# Altium PCB PCB_7000_0303_Rev13.PcbDoc (part 3 of 3)
Units mil, origin at the board's own origin, x right, y up, seen from the top; angles counter-clockwise.
Board outline 6252 x 3995 mil, 4 copper layers (Top Layer, Power, GND, Bottom Layer), stack 62.449 mil thick; 124 components, 105 nets, 610 pads, 262 vias.
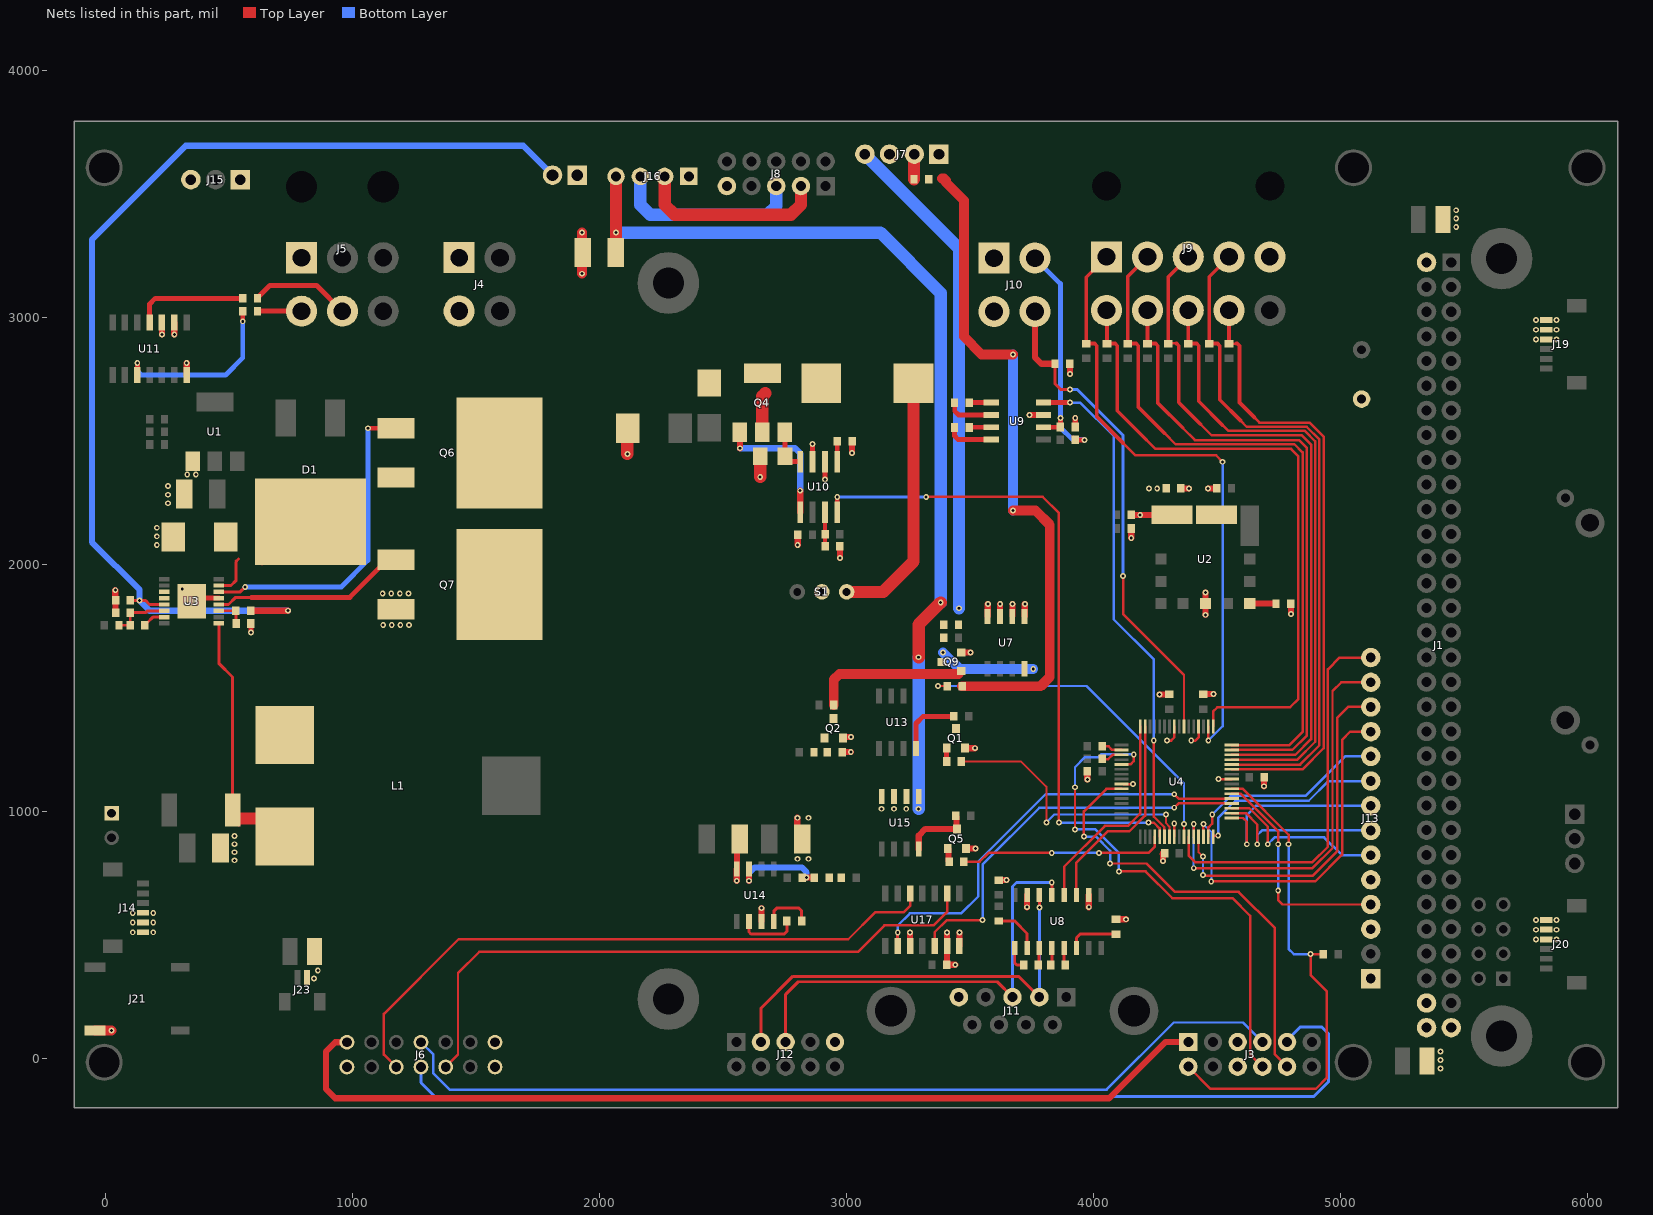
[diagram p4: the nets of this part, all layers, seen from the top]

## Via types
v1: diameter 23.62, hole 11.81, Top Layer to Bottom Layer, 262 vias

## Nets (pads, with @x,y where several pads share a name; then routed paths per layer and width w, separated by ;. In a path a pad name is that pad's centre, name@x,y a point inside that pad or via, vN(x,y) a via of type N, cw(c..) or ccw(c..) an arc to the next point about the centre after c; other vN are vias at no path point) (continued)
DCIN_RVP: C1.1 D1.2 Q6.2 U3.15 | length 575.7
  Top Layer w12: U3.15@458.24,1914.98 507.98,1914.98 527,1934 527,2011 538,2022 ; D1.2@633.06,2003 714.06,2084 D1.2@748,2084 ; D1.2@641,2004.96 810,2173.96 D1.2@829,2173.96
FCOFF: R43.1 U11.11 | length 460.9
  Top Layer w20: U11.11@178,2980.6 178,3055 201,3078 R43.1@555,3078
FCON: R42.1 U11.3 | length 733.2
  Top Layer w20: U11.3@128,2768 v1(128,2816.6) ; v1(555,2985) R42.1@555,3026
  Bottom Layer w20: v1(128,2816.6) 128,2784 145,2767 485,2767 555,2837 v1(555,2985)
GND: C1.2 C2.2 C3.2 C4.1 C5.2 C6.2 C7.1 C8.1 C9.1 C10.1 C11.2 C12.1 C17.1 C18.1 C20.1 C21.1 C22.1 C28.1 C31.1 C32.2 C33.1 C34.2 C35.1 C37.2 C38.2 C44.1 C45.2 J1.2 J1.62 J1.63 J1.64 J3.5 J3.6 J4.1 J4.3 J5.1 J6.1 J6.13 J6.14 J7.2 J7.3 J8.9 J9.5 J10.1 J10.3 J11.5 J12.9 J13.1 J13.3 J13.5 J14.4 J14.5 J14.6 J15.1 J15.3 J16.1 J17.1 J18.1 J19.4 J19.5 J19.6 J20.4 J20.5 J20.6 J21.1 J23.1 Q1.2 Q2.2 Q5.2 Q7.3 Q9.2 R4.2 R7.1 R9.1 R19.1 R25.1 R28.1 R40.1 U1.1 U2.3 U2.7 U3.3 U3.4 U3.13 U3.17 U4.9 U4.20 U4.25 U4.41 U4.56 U8.10 U8.15 U9.7 U10.6 U10.7 U11.7 U11.9 U11.10 U14.3 U14.8 U17.3 U17.6 U17.7 | length 3094.2
  Top Layer w10: U4.41@4123.87,1110.94 v1(4161,1110.94) ; v1(4298.57,1287) 4315.57,1287 4328.16,1299.58 U4.25@4328.16,1344.23 ; U4.56@4328.16,897.77 v1(4328.16,950.84) ; v1(4397,1287) 4414,1287 4426.58,1299.58 U4.20@4426.58,1344.23 ; v1@4507.15,1130.82 U4.9@4561.23,1130.84
  Top Layer w20: U3.17@348,1851 360.8,1863.8 U3.13@458.24,1863.8 ; C10.1@588,1761 589,1760 v1(589,1725) ; U10.7@2863,2416.43 v1(2863,2487.85) ; v1(2913,2345) U10.6@2913,2416.43
  Top Layer w22: C44.1@3927,2557 v1(3927,2594)
  Top Layer w25: v1(39,1896) 39,1856 C12.1@40,1855 C11.2@40,1805 ; v1(228,2932) U11.10@228,2980.6 ; v1(278,2932) U11.9@278,2980.6 ; U3.17@310,1889 v1(310,1901) 348,1863 U3.17@348,1851 ; U11.7@328,2768 v1(328,2816.6) ; v1(2556,719) U14.8@2556,766.3 2556.69,766.99 2556.69,875.76 C34.2@2568.93,888 ; U14.3@2656,553.7 v1(2656,608) ; v1@2801,974 2801,908.93 C35.1@2821.93,888 ; C45.2@2802.75,2120.32 2802.75,2115.44 2802.88,2115.32 v1(2802.88,2079.12) ; v1(2974,2026) R28.1@2974,2074 ; R40.1@2983,1240 2984,1241 v1(3018,1241) ; Q2.2@2985.4,1297.63 2985.4,1298.36 2989.04,1302 v1(3019,1302) ; v1(3023,2452) C33.1@3023,2500 ; U17.3@3258,454.7 v1(3258,509) ; C20.1@3407,379 C20.1@3408,379 ; v1(3408,509) U17.6@3408,454.7 C20.1@3408,379 ; v1(3441,379) C20.1@3408,379 ; U17.7@3458,454.7 v1(3458,509) ; Q9.2@3465.37,1643.4 3465.97,1644 v1(3503,1644) ; Q1.2@3481.4,1256.26 3481.53,1256.13 v1(3520.87,1256.13) v1@3521,1256 ; Q5.2@3485.4,850.63 3486.03,850 v1(3523,850) ; C28.1@3617,722 v1(3648.06,722) ; v1(3732,612) U8.15@3732,661.46 ; v1(3742,2606) U9.7@3799.3,2606 ; R19.1@3905,2813 3906,2812 v1(3906,2772) ; v1(3976,1129) C22.1@3976,1163 ; v1(3982,612) U8.10@3982,661.46 ; C31.1@4092,563 v1(4132.46,563) ; v1(4154,2107) R9.1@4154,2146 ; v1(4268,1474) C21.1@4308,1474 ; C17.1@4280,828 4282,830 v1(4282,799) ; C4.1@4355,2309 4356,2308 v1(4388,2308) ; C18.1@4446,1474 4447,1475 v1(4487,1475) ; U2.7@4454,1842 U2.7@4454.58,1841.42 ; v1(4454.58,1796.29) U2.7@4454.58,1841.42 ; v1(4454.58,1886.55) U2.7@4454.58,1841.42 ; v1(4465,2308) 4499,2308 C8.1@4500,2309 ; U2.3@4499,2202 U2.3@4500,2203 ; C9.1@4691,1138 C9.1@4692,1139 ; v1(4692,1102) C9.1@4692,1138 ; R7.1@4800,1841 4801,1840 v1(4801,1800)
  Top Layer w40: J21.1@-43.25,113.05 v1(24,113) ; C37.2@1928,3260.93 1929,3259.93 v1(1929,3178) ; C37.2@1929.54,3262.46 v1(1929.54,3344.39)
  Top Layer w50: C37.2@1928,3260.93 1929.54,3262.46 C37.2@1931.07,3264 ; v1(2113,2448) 2113,2550.6 C32.2@2114.4,2552 ; v1(2651,2355) R25.1@2651,2439 ; R4.2@3274,3561 3274,3661 J7.2@3275,3662
  other v1: 5406,-41 5406,-7 5406,27 843.16,323 859.16,355 5792.69,481.38 5876.03,481.38 109.45,510.33 192.55,510.33 5792.69,520.74 5876.03,520.74 109.45,549.69 192.55,549.69 5792.69,560.12 5876.03,560.12 109.45,589.07 192.55,589.07 522,801.96 2802,808 2847,808 522,834.64 522,867.32 522,900 2802,974 2847,974 4507.13,1130.8 1124,1755 1158.68,1755 1193.36,1755 1228.04,1755 1121.88,1883 1156.56,1883 1191.24,1883 1225.92,1883 207,2079.64 207,2114.32 207,2149 252.99,2248 252.99,2282.68 252.99,2317.36 330.32,2364 365,2364 5792.94,2911.38 5876.03,2911.38 5792.94,2950.74 5876.03,2950.74 5792.94,2990.11 5876.03,2990.11 5470,3367 5470,3401 5470,3435
GPS_EN: R30.2 U4.52 | length 839.2
  Top Layer w10: R30.2@3476,796 3540,796 3576,832 v1(3832,832) ; v1(4023,832) 4224,832 4249.42,857.42 U4.52@4249.42,897.77
  Bottom Layer w10: v1(3832,832) v1(4023,832)
J16_2: J8.3 J16.2 | length 776.1
  Top Layer w50: J16.2@2264,3572 2264,3457 2304,3417 2776,3417 2816,3457 J8.3@2816,3533
J16_3: J8.5 J16.3 | length 777.8
  Bottom Layer w50: J16.3@2165.57,3572 2165.57,3456.43 2205,3417 2681,3417 2716,3452 J8.5@2716,3533
J16_4: C37.1 J16.4 U15.5 U15.6 U15.7 U15.8 | length 3851.1
  Top Layer w50: C37.1@2065.93,3264 2067,3265.07 2067,3359 2067.15,3359.15 J16.4@2067.15,3572 ; v1(3292.69,1624.31) 3292.69,1756.69 v1(3382,1846)
  Bottom Layer w50: v1(2067,3344.39) 3137.61,3344.39 3382,3100 v1(3382,1846) ; v1(3292.69,1010.59) v1(3292.69,1624.31)
  other v1: 3142.69,1010.59 3192.69,1010.59 3242.69,1010.59
LED_GRN: J5.5 R43.2 | length 410.5
  Top Layer w20: R43.2@615,3078 615,3080.5 665.5,3131 853.71,3131 J5.5@958.64,3026.07
LED_RED: J5.6 R42.2 | length 178.3
  Top Layer w20: R42.2@615,3026 J5.6@793.25,3026.03
LITE_NEN: U4.53 U10.4 | length 2691.5
  Top Layer w10: v1(3323.25,2273.75) 3795.25,2273.75 3861,2208 v1(3861,955) ; v1(4224,955) 4245.07,955 4268.59,931.48 4268.59,898.28 U4.53@4269.1,897.77
  Top Layer w20: U10.4@2963,2211.7 v1(2963,2273.75)
  Bottom Layer w10: v1(3861,955) v1(4224,955)
  Bottom Layer w12: v1(2963,2273.75) v1(3323.25,2273.75)
MB_EN: R17.2 U4.55 | length 1125.7
  Top Layer w8: R17.2@3466,1202 3708,1202 3810,1100 v1(3810,955) ; v1(4295,988) 4295,952 4308.47,938.53 U4.55@4308.47,897.77
  Bottom Layer w8: v1(3810,955) 3843,988 v1(4295,988)
NetC10_2: C10.2 R13.1 U3.11 | length 121.3
  Top Layer w12: U3.11@458.24,1812.61 458.43,1812.81 526.81,1812.81 R13.1@527,1813 527.5,1812.5 527.5,1761.5 C10.2@528,1761
NetC11_1: C11.1 R5.1 R6.2 U3.6 | length 237.3
  Top Layer w12: R6.2@54,1754 R5.1@99,1754 99.5,1754.5 99.5,1804.5 C11.1@100,1805 161.75,1805 169.36,1812.61 U3.6@237.76,1812.61
NetC25_1: C25.1 U14.2 | length 270.6
  Top Layer w12: U14.2@2611.81,529.19 U14.2@2606,553.7 2606,511.73 2615.03,502.7 2747.67,502.7 2759,514.03 C25.1@2759,556
NetC25_2: C25.2 U14.4 | length 205.8
  Top Layer w12: U14.4@2706,553.7 2706,596 2718,608 2808,608 2819,597 C25.2@2819,556
NetC27_1: C27.1 U8.2 | length 194.8
  Top Layer w12: C27.1@3617,556 3682,556 3732,506 U8.2@3732,446.91
NetC29_1: C29.1 U8.3 | length 70.6
  Top Layer w12: C29.1@3778,378 3780,380 3780,444.91 U8.3@3782,446.91
NetC29_2: C29.2 U8.1 | length 100
  Top Layer w12: U8.1@3682,446.91 3682,386.38 3690.38,378 C29.2@3718,378
NetC30_1: C30.1 U8.4 | length 71
  Top Layer w12: C30.1@3827,378 3832,383 U8.4@3832,446.91
NetC30_2: C30.2 U8.5 | length 71
  Top Layer w12: U8.5@3882,446.91 3882,383 C30.2@3887,378
NetC31_2: C31.2 U8.6 | length 207.3
  Top Layer w12: U8.6@3932,446.91 3932,488 3947,503 C31.2@4092,503
NetC33_2: C33.2 U10.5 | length 83.6
  Top Layer w20: U10.5@2963,2416.43 C33.2@2963,2500
NetC41_1: C41.1 U9.2 | length 188.3
  Top Layer w20: C41.1@3438,2655 3438.96,2654.04 3438.96,2621.04 3454,2606 U9.2@3586.7,2606
NetC41_2: C41.2 U9.1 | length 87.7
  Top Layer w20: C41.2@3499,2656 U9.1@3586.7,2656
NetC42_1: C42.1 U9.4 | length 188.9
  Top Layer w20: C42.1@3438,2555 3438.46,2554.54 3438.46,2520.54 3453,2506 U9.4@3586.7,2506
NetC42_2: C42.2 U9.3 | length 87.7
  Top Layer w20: C42.2@3499,2556 U9.3@3586.7,2556
NetC43_1: C43.1 C44.2 J10.2 U9.6 | length 997.7
  Top Layer w15: C43.1@3919.5,2515 C43.1@3927,2505
  Top Layer w20: U9.6@3799.3,2556 C44.2@3864,2556 ; C44.2@3867,2557 v1(3867,2594) ; C43.1@3927,2505 v1(3964,2505)
  Bottom Layer w20: J10.2@3763.68,3241 3867,3137.68 3867,2555 3916.31,2505.69 3963.31,2505.69 v1(3964,2505)
NetD4_1: D4.1 L5.1 Q4.2 Q4.4 | length 164.2
  Top Layer w50: Q4.2@2659.45,2535 2659.45,2681.45 2672,2694
NetJ7_4: J7.4 R23.1 | length 1996.8
  Bottom Layer w50: J7.4@3075,3662 3075,3661.07 3456,3280.07 v1(3456,1823)
NetL1_1: L1.1 Q6.3 Q7.2
NetL5_2: L5.2 S1.2 | length 1044
  Top Layer w50: S1.2@3001,1889 3149,1889 3272.02,2012.02 L5.2@3272.02,2734
NetQ1_1: Q1.1 R17.1 | length 54.5
  Top Layer w20: R17.1@3406,1202 3406.3,1202.3 3406.3,1255.96 Q1.1@3406.6,1256.26
NetQ1_3: Q1.3 R21.1 U13.4 | length 266.3
  Top Layer w20: U13.4@3282,1254.7 3282,1356 3311,1385 R21.1@3435,1385
NetQ2_1: Q2.1 R40.2 R41.2
NetQ4_1: Q4.1 U10.1 | length 555.1
  Top Layer w25: v1(2568.9,2471) Q4.1@2568.9,2535 ; U10.1@2813,2211.7 v1(2813,2299)
  Bottom Layer w25: v1(2568.9,2471) 2792,2471 2813,2450 v1(2813,2299)
NetQ4_3: Q4.3 R25.2 U10.8 | length 168.9
  Top Layer w20: Q4.3@2751,2535 2751,2436.43 2771,2416.43 U10.8@2813,2416.43
NetQ5_1: Q5.1 R30.1 | length 56.9
  Top Layer w25: Q5.1@3410.6,850.63 3413.5,847.73 3413.5,798.5 R30.1@3416,796
NetQ5_3: Q5.3 R31.1 U15.4 | length 277.1
  Top Layer w25: U15.4@3293,847 3293,902 3320.37,929.37 Q5.3@3448,929.37 3445.76,931.61 3445.76,972.74 3445.5,973 3445.5,977 R31.1@3440.5,982
NetQ9_3: Q9.3 R23.2 R27.2 U7.4 | length 392.8
  Bottom Layer w40: v1(3392,1644) 3459,1577 v1(3757,1577)
NetR5_2: R5.2 U3.7 | length 93.9
  Top Layer w12: R5.2@159,1754 159,1756.5 168,1765.5 169.52,1765.5 190.93,1786.91 237.65,1786.91 U3.7@237.76,1787.02
NetR7_2: R7.2 U2.6 | length 105
  Top Layer w25: U2.6@4634,1842 R7.2@4739,1842
NetR24_2: R24.2 R45.1
PWR_BYP: J7.1 Q2.3 Q9.1 R4.1 R16.1 R22.1 | length 3320.5
  Top Layer w40: R16.1@2949,1431 2949,1533.57 2972.43,1557 Q9.1@3453.77,1557 ; 3387,3563 3396,3563 3403,3556 3403,3547 3476,3474 3476,2923 3548,2851 v1(3675,2851) ; R22.1@3469,1507 3787.25,1507 3824,1543.75 3824,2161 3766,2219 v1(3675,2219)
  Bottom Layer w40: v1(3675,2219) v1(3675,2851)
PWR_EN: R22.2 U4.58 | length 1414.1
  Top Layer w10: v1(3371,1508) 3408,1508 R22.2@3409,1507 ; U4.58@4367.53,897.77 v1(4367.53,948.9)
  Bottom Layer w10: v1(3371,1508) 3973,1508 4367.53,1113.47 v1(4367.53,948.9)
RAY_NEN: U4.54 U9.8 | length 2051.5
  Top Layer w10: v1(4245,1287) 4245,979.11 4288.28,935.84 4288.28,898.28 U4.54@4288.79,897.77
  Top Layer w20: U9.8@3799.3,2656 v1(3906,2656)
  Bottom Layer w10: v1@3902,2656 v1(3906,2656) 3947,2656 4083,2520 4083,1778 4244.19,1616.81 4244.19,1287.81 v1(4245,1287)
RB6: J3.10 U4.42 | length 1831.9
  Top Layer w10: v1(3962,898) 3962,1000 4053.47,1091.47 U4.42@4114.77,1091.47 ; v1(4068.28,789) 4216,789 4331,674 4589,674 4735.6,527.4 4735.6,15.4 J3.10@4785,-34
  Bottom Layer w10: v1(3962,898) 4011,898 4068.28,840.72 v1(4068.28,789)
RB6_MB: J3.9 J6.7 | length 4178.6
  Bottom Layer w12: J6.7@1277,-35 1277,-98.55 1333.95,-155.5 4892.5,-155.5 4952,-96 4952,100 4925.6,126.4 4838.4,126.4 J3.9@4788,76
RB7: J3.8 U4.37 | length 2124.1
  Top Layer w10: v1(3926,927) v1(3926,1098) ; v1(4104,757) 4212,757 4320,649 4564,649 4636,577 4636,78 4635.6,77.6 4635.6,15.4 J3.8@4685,-34 ; U4.37@4114.77,1189.9 4115.28,1190.41 4150.41,1190.41 4164,1204 v1(4164,1231)
  Bottom Layer w10: v1(3926,927) 4009,927 4104,832 v1(4104,757) ; v1(3926,1098) 3926,1179 3967,1220 4022,1220 4033,1231 v1(4164,1231)
RB7_MB: J3.7 J6.8 | length 3677.4
  Bottom Layer w10: J6.8@1277,65 1327,15 1327,-61 1393,-127 4054,-127 4326,145 4606,145 J3.7@4685,66
RE0: J13.7 U4.2 | length 706.1
  Top Layer w10: U4.2@4561.23,993.05 4617.95,993.05 4664.33,946.67 v1(4664.33,867)
  Bottom Layer w10: v1(4664.33,867) 4664.33,903.33 4684,923 J13.7@5124,923
RE1: J13.8 U4.1 | length 794.5
  Top Layer w10: U4.1@4561.23,973.36 4606.64,973.36 4622,958 v1(4622,867)
  Bottom Layer w10: v1(4622,867) 4622,986 4659,1023 J13.8@5124,1023
RE2: J13.9 U4.64 | length 776
  Top Layer w10: U4.64@4485.64,897.77 4485.64,901.49 4486.15,902 v1(4506,902)
  Bottom Layer w10: v1(4506,902) 4506,974 4575,1043 4873,1043 4953,1123 J13.9@5124,1123
RE3: J13.10 U4.63 | length 836.2
  Top Layer w10: U4.63@4465.95,897.77 4466.46,898.28 4466.46,935.42 4482,950.96 v1(4482,988)
  Bottom Layer w10: v1(4482,988) 4557,1063 4860,1063 5020,1223 J13.10@5124,1223
RE4: J13.11 U4.62 | length 1467.7
  Top Layer w10: U4.62@4446.27,897.77 U4.62@4446.27,912.19 ; v1(4446.27,948.9) U4.62@4446.27,912.19 ; U4.62@4446.78,911.67 U4.62@4446.27,912.19 ; v1(4478,716) 4478.19,716.19 4899.19,716.19 5008,825 5008,1290 5041,1323 J13.11@5124,1323
  Bottom Layer w8: v1(4446.27,948.9) 4478,917.17 v1(4478,716)
RE5: J13.12 U4.61 | length 1442.8
  Top Layer w8: U4.61@4426.58,897.77 4426.58,834.42 v1(4444,817)
  Top Layer w10: v1@4444,740 4890,740 4989,839 4989,1380 5032,1423 J13.12@5124,1423
  Bottom Layer w8: v1(4444,742) v1(4444,817)
RE6: J13.13 U4.60 | length 1631.6
  Top Layer w10: v1(4406.9,770) 4888,770 4969,851 4969,1487 5005,1523 J13.13@5124,1523 ; U4.60@4406.9,897.77 v1(4406.9,948.9)
  Bottom Layer w8: v1(4406.9,770) v1(4406.9,948.9)
RE7: J13.14 U4.59 | length 1590.3
  Top Layer w10: U4.59@4387.21,897.77 4387.21,819.79 4413.81,793.19 4886.47,793.19 4950,856.72 4950,1575 4998,1623 J13.14@5124,1623
RF0: J9.1 R33.2 U4.18 | length 2513.9
  Top Layer w10: 4120.5,2492.5 4171,2442 4498,2442 v1(4524,2416) ; v1(4465.95,1287) U4.18@4465.95,1344.23
  Top Layer w15: J9.1@4054,3246 3972,3164 R33.2@3972,2895 4005.21,2895 4014,2886.21 4014,2599 4120.5,2492.5
  Bottom Layer w10: v1(4465.95,1287) 4524,1345.05 v1(4524,2416)
RF1: J9.6 R39.2 U4.17 | length 2663.4
  Top Layer w10: 4215.04,2504.96 4252,2468 4801,2468 4831,2438 4831,1456 4797,1422 4503,1422 4485.64,1404.64 U4.17@4485.64,1344.23
  Top Layer w15: J9.6@4055.57,3027.89 R39.2@4055.57,2895 4088.78,2895 4097.57,2886.21 4097.57,2622.43 4215.04,2504.96
  Top Layer w20: J9.6@4054,3029.46 J9.6@4055.57,3027.89
RF2: J9.2 R34.2 U4.16 | length 2860.6
  Top Layer w10: 4288.14,2532 4333.14,2487 4815,2487 4848,2454 4848,1322 4794.64,1268.64 U4.16@4561.23,1268.64
  Top Layer w15: J9.2@4219.35,3246 4140.14,3166.79 R34.2@4140.14,2895 4173.36,2895 4182.14,2886.21 4182.14,2638 4288.14,2532
RF3: J9.7 R38.2 U4.15 | length 2612.6
  Top Layer w10: R38.2@4219.83,2895.11 4248.83,2895.11 ; 4362.5,2553.5 4412,2504 4833,2504 4865,2472 4865,1308 4805.95,1248.95 U4.15@4561.23,1248.95
  Top Layer w15: J9.7@4219.53,3029.28 4219.53,2895.18 4252.75,2895.18 4261.53,2886.39 4261.53,2654.47 4362.5,2553.5
  Top Layer w20: J9.7@4219.35,3029.46 J9.7@4219.53,3029.28 ; R38.2@4219.53,2895.18 R38.2@4219.71,2895 R38.2@4219.83,2895.11
RF4: J9.3 R35.2 U4.14 | length 2803.3
  Top Layer w10: R35.2@4305.3,2896.01 4334.3,2896.01 ; 4434.79,2568.22 4480,2523 4845,2523 4882,2486 4882,1293 4818.27,1229.27 U4.14@4561.23,1229.27
  Top Layer w15: R35.2@4304.29,2895 4304.29,3165.58 J9.3@4384.71,3246 ; 4337.5,2895 4346.29,2886.21 4346.29,2656.71 4434.79,2568.22
  Top Layer w20: R35.2@4304.29,2895 R35.2@4305.3,2896.01
RF5: J9.8 R37.2 U4.13 | length 2529.3
  Top Layer w10: 4522.76,2565.24 4547,2541 4857,2541 4899,2499 4899,1282 4826.58,1209.58 U4.13@4561.23,1209.58
  Top Layer w15: R37.2@4384.85,2895.15 J9.8@4384.85,3029.32 ; R37.2@4385,2895 4418.21,2895 4427,2886.21 4427,2661 4522.76,2565.24
  Top Layer w20: J9.8@4384.71,3029.46 J9.8@4384.85,3029.32 ; R37.2@4384.85,2895.15 R37.2@4385,2895
RF6: J9.4 R36.2 U4.12 | length 2795.1
  Top Layer w8: R36.2@4470.01,2902.01 R36.2@4477.01,2895.01
  Top Layer w10: R36.2@4477.02,2895 4499,2895 4512,2882 ; U4.12@4561.23,1189.9 4837.9,1189.9 4916,1268 4916,2506.04 4864.04,2558 4621,2558 4596,2583
  Top Layer w15: J9.4@4550.06,3246 4470,3165.94 R36.2@4470,2895 4477.01,2895.01 4503.22,2895.01 4512.01,2886.22 4512.01,2666.99 4596,2583
RF7: J9.9 R32.2 U4.11 | length 2496.2
  Top Layer w10: R32.2@4550,2895 4579,2895 4592,2882 ; U4.11@4561.23,1170.21 4847.21,1170.21 4933,1256 4933,2518 4876,2575 4673,2575 4653,2595
  Top Layer w15: R32.2@4550,2895 J9.9@4550.03,3029.43 ; 4579,2895 4583.21,2895 4592,2886.21 4592,2882 4592,2656 4653,2595
RG0: J13.6 U4.3 | length 706.3
  Top Layer w10: U4.3@4561.23,1012.73 4632.23,1012.73 4706.67,938.29 v1(4706.67,867)
  Bottom Layer w10: v1(4706.67,867) 4734.67,895 4935,895 5007,823 J13.6@5124,823
RG3: J13.4 U4.6 | length 912.1
  Top Layer w10: U4.6@4561.23,1071.79 4561.74,1071.28 4597.72,1071.28 4749,920 v1(4749,867) ; v1(4749,679) 4749,641 4767,623 J13.4@5124,623
  Bottom Layer w10: v1(4749,679) v1(4749,867)
RX-: J6.6 U17.11 | length 2493
  Top Layer w10: J6.6@1177,65 1177,182 1460,465 3020.7,465 3127.7,572 3287.7,572 3308,592.3 U17.11@3308,667.3
RX+: J6.5 U17.12 | length 2597.8
  Top Layer w10: J6.5@1177,-35 1127,15 1127,180 1429,482 3007.7,482 3118,592.3 3233,592.3 3258,617.3 U17.12@3258,667.3
SCL: R20.1 U4.34 | length 85
  Top Layer w10: R20.1@4036,1264 4062,1264 4076.54,1249.46 4114.26,1249.46 U4.34@4114.77,1248.95
SDA: R18.2 U4.35 | length 87.3
  Top Layer w10: R18.2@4036,1213.5 4038.36,1211.14 4060.14,1211.14 4078.27,1229.27 U4.35@4114.77,1229.27
TEMP: J10.4 R19.2 U4.23 | length 2001.8
  Top Layer w10: v1(4121,1953) 4121,1799 4367.53,1552.47 U4.23@4367.53,1344.23
  Top Layer w12: R19.2@3845,2813 3845,2732.03 3867.56,2709.47 v1@3904.85,2709.47
  Top Layer w25: J10.4@3763.68,3024.47 3763.68,2839.32 3790,2813 R19.2@3845,2813
  Bottom Layer w12: v1@3904.85,2709.47 3934.53,2709.47 4121,2523 v1(4121,1953)
  other v1: 3906,2709.47
TX-: J6.10 U17.10 | length 2433.7
  Top Layer w10: J6.10@1377,65 1377,337 1488,448 3033.7,448 3140.7,555 3320.7,555 3358,592.3 U17.10@3358,667.3
TX+: J6.9 U17.9 | length 2559.1
  Top Layer w10: J6.9@1377,-35 1427,15 1427,345 1513,431 3046.7,431 3153.7,538 3353.7,538 3408,592.3 U17.9@3408,667.3
U2VIN: C4.2 R8.1 S1.1 U2.2 U7.5 U7.6 U7.7 U7.8 | length 361.6
  Top Layer w25: U7.8@3572,1790.3 3572.69,1790.99 3572.69,1839.69 v1(3573,1840) ; U7.7@3622.69,1790.99 v1@3622.69,1839.69 ; U7.6@3672.69,1790.99 v1@3672.69,1839.69 ; U7.5@3722.69,1790.99 v1@3722.69,1839.69 ; R8.1@4154,2201 v1(4190,2201) 4318,2201 U2.2@4319,2202
  other v1: 3623,1840 3673,1840 3723,1840 4226,2308 4259,2308
U3BGATE: Q7.1 U3.12 | length 791.6
  Top Layer w12: U3.12@458.24,1838.2 497.89,1838.2 526.68,1867 590,1867 ; Q7.1@1140.91,2019 Q7.1@1174.96,2019
  Top Layer w20: 590,1867 988.91,1867 Q7.1@1140.91,2019
U3SENSE: L1.2 R11.2 U3.9 | length 1123
  Top Layer w12: U3.9@458.24,1761.43 458.24,1599.76 513.95,1544.05 R11.2@513.95,1005 513.95,969.57 R11.2@539.45,944.07
  Top Layer w50: R11.2@513.95,1005 513.95,977.5 520.45,971 653.52,971 L1.2@725.83,898.68
U3TGATE: Q6.1 U3.14 | length 1304.9
  Top Layer w12: U3.14@458.24,1889.39 545.39,1889.39 v1(565,1909)
  Top Layer w20: v1(1062,2552) Q6.1@1175,2552
  Bottom Layer w20: v1(565,1909) 954.39,1909 1062,2016.61 v1(1062,2552)
U8RIN1: J11.3 J12.5 U8.13 | length 1823
  Top Layer w12: J12.5@2754,66 2754,259 2805,310 3610.77,310 J11.3@3672.87,247.9 ; U8.13@3832,661.46 v1(3832,712)
  Bottom Layer w12: J11.3@3672.87,247.9 3672.87,695.87 3689,712 v1(3832,712)
U8T1OUT: J11.2 J12.3 U8.14 | length 1766.6
  Top Layer w12: J12.3@2654,66 2654,203 2783,332 3697.43,332 J11.2@3781.53,247.9 ; v1(3782,610.92) U8.14@3782,661.46
  Bottom Layer w12: J11.2@3781.53,247.9 3781.77,248.13 3781.77,610.68 v1(3782,610.92)
U10FB: R26.1 R28.2 U10.3 | length 138.1
  Top Layer w15: U10.3@2913,2211.7 2913.5,2211.2 2913.5,2074.5 R28.2@2914,2074
U14FB: R24.1 R29.2 U14.7 | length 364.2
  Top Layer w25: v1(2606,719) U14.7@2606,766.3 ; v1(2839,732) 2852.5,732
  Bottom Layer w25: v1(2606,719) 2606,751 2628,773 2819,773 2839,753 v1(2839,732)
UARTRX1: U4.32 U8.12 | length 865
  Top Layer w10: U8.12@3882,661.46 3882,776 4047,941 4140,941 4190.36,991.36 U4.32@4190.36,1344.23
UARTRX2: U4.5 U17.2 | length 1746.5
  Top Layer w10: v1(4328.16,1069.52) 4345.57,1052.1 U4.5@4561.23,1052.1
  Top Layer w12: U17.2@3208,454.7 v1(3208,509)
  Bottom Layer w10: v1(3208,509) 3208,538 3257,587 3465,587 3534,656 3534,797 3806.52,1069.52 v1(4328.16,1069.52)
UARTTX1: U4.31 U8.11 | length 849.4
  Top Layer w10: U8.11@3932,661.46 3932,793 4058,919 4145.84,919 4210.05,983.21 U4.31@4210.05,1344.23
UARTTX2: U4.4 U17.5 | length 1607.3
  Top Layer w10: U17.5@3358,454.7 3358,511 3407,560 v1(3552,560) ; v1(4328.16,1015) 4345.57,1032.42 U4.4@4561.23,1032.42
  Bottom Layer w10: v1(3552,560) 3552,785 3782,1015 v1(4328.16,1015)
VPP: J3.2 R10.2 U4.7 | length 2063.7
  Top Layer w10: J3.2@4385,-34 4475,-124 4900.99,-124 4945,-79.99 4945,272 4880,337 v1(4880,422) R10.2@4932,422 ; U4.7@4561.23,1091.47 4561.74,1090.96 4606.04,1090.96 4791.33,905.67 v1(4791.33,867)
  Bottom Layer w10: v1(4791.33,867) 4791.33,442.67 4812,422 v1(4880,422)
VPP_MB: J3.1 J6.2 | length 3854.9
  Top Layer w25: J6.2@977,65 930,65 892,27 892,-124 930,-162 4064,-162 4292,66 J3.1@4385,66
VTEMP: C12.2 J17.2 R13.2 U3.5 | length 4530.3
  Top Layer w12: C12.2@100,1855 101,1854 v1(137,1854) 162,1854 177.8,1838.2 U3.5@237.76,1838.2
  Top Layer w25: R13.2@587,1813 v1(739,1813)
  Bottom Layer w25: v1(739,1813) 178,1813 v1(137,1854) 137,1898 -56,2091 -56,3316 324,3696 1691,3696 J17.2@1810,3577
pads on no net: J1.1 J1.3 J1.4 J1.5 J1.7 J1.8 J1.9 J1.10 J1.11 J1.12 J1.13 J1.14 J1.15 J1.16 J1.17 J1.18 J1.19 J1.20 J1.21 J1.22 J1.23 J1.24 J1.25 J1.26 J1.27 J1.28 J1.29 J1.30 J1.31 J1.32 J1.33 J1.34 J1.35 J1.36 J1.37 J1.38 J1.39 J1.40 J1.41 J1.42 J1.43 J1.44 J1.45 J1.46 J1.47 J1.48 J1.49 J1.50 J1.51 J1.52 J1.53 J1.54 J1.55 J1.56 J1.57 J1.59 J1.60 J1.61 J2.1 J2.2 J2.4 J2.5 J2.6 J2.8 J3.11 J3.12 J5.2 J5.MH J8.1 J8.2 J8.4 J8.6 J8.7 J8.8 J8.10 J9. J11.1 J11.4 J11.6 J11.7 J11.8 J11.9 J11.10 J11.11 J12.1 J12.2 J12.4 J12.6 J12.7 J12.8 J12.10 J14.MP1 J14.MP2 J19.MP1 J19.MP2 J20.MP1 J20.MP2 J21.3 J21.4 J22.3 J23.3 J23.4 J24.3 L1.3 S1.3 U2.1 U2.8 U2.9 U2.10 U2.11 U2.12 U3.8 U4.8 U4.21 U4.22 U4.27 U4.28 U4.29 U4.30 U4.33 U4.36 U4.39 U4.40 U4.43 U4.44 U4.45 U4.46 U4.47 U4.48 U4.49 U4.50 U4.51 U8.7 U8.8 U8.9 U11.8 U17.1 U17.8 U17.13

## Polygon pours and split planes (outlines as drawn)
GND on Bottom Layer "NONET_L-01_P-001" (solid, pour order 1): -127,3795 -126,3795 6125,3796 6125,-200 -127,-200 -127,-90
GND on Top Layer "NONET_L-01_P-001" (solid, pour order 0): -127,3795 -126,3795 6125,3796 6125,-200 -127,-200 -127,-90
GND on GND (split plane): 6104.9,-179.9 -106.9,-179.9 -106.9,3774.9 6104.9,3774.9
BCKBATT- on GND (split plane): 6056.93,597.07 5628.07,597.07 5628.07,716 5628.07,2342.93 6056.93,2342.93
+9.9V on Power (split plane): 5897.93,2753.57 5745,2753.57 5742.06,2753.28 5739.23,2752.43 5736.63,2751.03 5734.34,2749.16 5732.47,2746.87 5731.07,2744.27 5730.22,2741.44 5729.93,2738.5 5729.93,1637.24 5602.34,1509.66 5600.47,1507.37 5599.07,1504.77 5598.22,1501.94 5597.93,1499 5597.93,1446 5597.93,1445 5597.93,373 5598.22,370.06 5599.07,367.23 5600.47,364.63 5602.34,362.34 5604.63,360.47 5607.23,359.07 5610.06,358.22 5613,357.93 5775.94,357.93 5778.88,358.22 5781.71,359.07 5784.31,360.47 5786.6,362.34 5788.47,364.63 5789.87,367.23 5790.72,370.06 5791.01,373 5791.01,595.93 5929.93,595.93 5929.93,247 5929.93,234.24 5821.34,125.66 5819.47,123.37 5818.07,120.77 5817.22,117.94 5816.93,115 5816.93,-179.9 -106.9,-179.9 -106.9,1036.93 1644,1036.93 1646.94,1037.22 1649.77,1038.07 1652.37,1039.47 1654.66,1041.34 1656.53,1043.63 1657.93,1046.23 1658.78,1049.06 1659.07,1052 1659.07,2182.93 2137,2182.93 2139.94,2183.22 2142.77,2184.07 2145.37,2185.47 2147.66,2187.34 2256.66,2296.34 2258.53,2298.63 2259.93,2301.23 2260.78,2304.06 2261.07,2307 2261.07,2661.93 2402.93,2661.93 2402.93,2302 2403.22,2299.06 2404.07,2296.23 2405.47,2293.63 2407.34,2291.34 2529.34,2169.34 2531.63,2167.47 2534.23,2166.07 2537.06,2165.22 2540,2164.93 3088.93,2164.93 3088.93,1968.07 1804,1968.07 1801.06,1967.78 1798.23,1966.93 1795.63,1965.53 1793.34,1963.66 1791.47,1961.37 1790.07,1958.77 1789.22,1955.94 1788.93,1953 1788.93,712.07 237,712.07 234.06,711.78 231.23,710.93 228.63,709.53 226.34,707.66 224.47,705.37 223.07,702.77 222.22,699.94 222.11,698.83 222.07,698.77 221.22,695.94 220.93,693 220.93,57 221.22,54.06 222.07,51.23 223.47,48.63 225.34,46.34 355.34,-83.66 357.63,-85.53 360.23,-86.93 363.06,-87.78 366,-88.07 5508,-88.07 5510.94,-87.78 5513.77,-86.93 5516.37,-85.53 5518.66,-83.66 5520.53,-81.37 5521.93,-78.77 5522.78,-75.94 5523.07,-73 5523.07,2882.93 5897.93,2882.93
+5V on Power (split plane): 175 vertices, not listed, extent -106.9,-179.9 6104.9,3774.9
BCKBATT+ on Power (split plane): 6048.93,815.07 5775.94,815.07 5773,814.78 5770.17,813.93 5767.57,812.53 5765.28,810.66 5763.41,808.37 5762.01,805.77 5761.16,802.94 5760.87,800 5760.87,388.07 5628.07,388.07 5628.07,1430.93 6048.93,1430.93
U2VIN on Power (split plane): 4405.93,2160.07 4104,2160.07 4101.06,2159.78 4098.23,2158.93 4095.63,2157.53 4093.34,2155.66 3735.76,1798.07 2763.07,1798.07 2763.07,1937.93 3641,1937.93 3643.94,1938.22 3646.77,1939.07 3649.37,1940.47 3651.66,1942.34 4051.24,2341.93 4405.93,2341.93

## Other copper
Top Layer:
  rectangle net U3SENSE: 482,931 845,1072
  region net BATT+: 378,1609.4 378,1715 -28.03,1715 -28.03,1609.4
  rectangle net BATT+: -28,1619 25,1778
  region net NetL1_1: 1772,1510 607.7,1510 607.7,1276.6 1772,1276.6
  region net GND: 1251,1733 1251,1907 1100,1907 1100,1733
  rectangle net DCIN_RVP: 685,2156 1254,2392
  rectangle net GND: 431,784 552.47,915.84
  rectangle net GND: 191,2050 266,2181
  rectangle net GND: 216,1855 323,1898
  rectangle net GND: 226,2050 381.45,2458
  region net +5VLEDS: 223,2698 223,2478 485,2478 485,2698
  rectangle net GND: 92.45,491.56 211.45,602.07
  rectangle net +9.9V: 92.39,609.66 211.39,720.17
  region net +9.9V: 2277,2652 2277,2453 2369,2453 2369,2652
  region net +5V_MB: 3056,1501 3056,711 3099,711 3099,1501
  rectangle net +5V: 3112,1223.7 3252,1326.7
  region net +5V_MB: 2401.48,948.03 2401.48,504 2471,504 2471,948.03
  region net +5V_MB: 2401,602 2401,502.03 2574,502.03 2574,602
  region net +5V_MB: 2570.03,543 2335.03,543 2335.03,502.52 2570.03,502.52
  rectangle net +5V_MB: 3024.5,711 3099,754
  rectangle net -5V_MB: 2656.76,829.5 2742.76,984.38
  rectangle net -5V_MB: 2694,712 2777,756
  rectangle net +5V_MB: 2542,523 2570,587.63
  rectangle net GND: 2782,793 2868,993
  rectangle net NetD4_1: 2617,2493 2692,2676
  rectangle net NetQ9_3: 3710,1546 3781,1610
  rectangle net NetJ7_4: 3430,1733 3481,1841
  rectangle net U2VIN: 4136,2178 4309,2224
  rectangle net U2VIN: 4207.34,2164.01 4310.34,2327.01
  rectangle net NetR24_2: 2909.5,712 2995,755
  rectangle net U14FB: 2800,712 2885,755
  region net +5V: 788,296 788,488 716,488 716,296
  rectangle net +5V: 3596,602 3693,691
  region net -5V_MB: 2731,712 2731,947 2681,947 2681,712
  rectangle net +5V: 3123,816 3263,919
  region net +5V: 5282,45 5174,45 5174,-68 5282,-68
  rectangle net GND: 5322,-67 5430,46
  region net +5V: 5346,3453 5238,3453 5238,3340 5346,3340
  rectangle net BATT+: 3556,1543 3688,1611.87
  rectangle net U2VIN: 3557,1755 3738,1858
  rectangle net +5V: 4545,2284 4659,2335
  rectangle net GND: 4416,2165 4519,2328
  rectangle net +5V: 4597.4,1995.66 4672,2335
  rectangle net GND: 4340,2288 4513,2329
  rectangle net PWR_BYP: 3316,3536 3416,3584
  rectangle net NetD4_1: 2394,2651 2981,2820
  rectangle net NetQ4_3: 2705,2372 2825,2579
  rectangle net NetQ4_3: 2725,2372 2825,2452
  rectangle net +5V_MB: 3056,1437 3295,1501
  rectangle net PWR_BYP: 3447,1489 3491,1585
  rectangle net NetQ9_3: 3369,1589 3411,1777
  rectangle net NetQ1_3: 3418,1316 3465,1407
  rectangle net PWR_BYP: 2929,1358.37 2970,1453.37
  rectangle net NetQ2_1: 2853,1223 2940,1317
  rectangle net GND: 2964,1222 3005,1317
  rectangle net J16_4: 3123,989 3316,1092
  rectangle net GND: 3132,3612 3317,3712
  rectangle net PWR_BYP: 3336,3536 3423,3711
  rectangle net +9.9V: 2277,2493 2497,2614
  rectangle net GND: 5386,3341 5494,3454
  rectangle net DCIN_RVP: 438,1997 1058,2171
  region net DCIN: 606,2607 500.55,2607 500.55,2377 606,2377
  rectangle net DCIN: 573,2497 972,2690
  region net GND: 876.16,296 876.16,488 804.16,488 804.16,296
  rectangle net +5VLEDS: 406,2221 485,2671
  rectangle net NetL1_1: 1417,1275 1771,2672
  rectangle net GND: 215,2949 293,3013
  rectangle net +9.9V: 5776,344.49 5895,455
  rectangle net GND: 5775.94,465 5894.94,575.12
  rectangle net GND: 5775.94,2896 5894.94,3006.11
  rectangle net +9.9V: 5776,2776.49 5895,2887
  region net DCIN_RVP: 604,2349 648,2392 691,2392 725,2358 718,2351 718,2344 604,2344
Bottom Layer:
  rectangle net J16_4: 3122,960 3317,1053
  rectangle net -5V_MB: 2659,800 2749,990
Power (plane layer: these items are gaps in the copper):
  lines w20: 1985,3792 2030,3792
  lines w30: 236,693 236,57 366,-73 965,-73 1864,-73 5508,-73 5508,2898 5913,2898 5913,2738.5 5745,2738.5 5745,1631 5613,1499 5613,1445 ; 237,697 1804,697 1804,1953 3102,1953 3104,1955 3104,2180 2540,2180 2418,2302 2418,2677 2246,2677 2246,2307 2137,2198 1644,2198 1644,1052 595,1052 ; 639,1052 -128,1052 -128,-199 -127,-200 5827,-200 5832,-195 5832,115 5945,228 5945,247 5945,611 5778,611 ; 6064,800 5775.94,800 5775.94,373 5613,373 5613,1446 6064,1446 6064,803 ; 2748,1783 2748,1953 2866,1953 3641,1953 4045,2357 4421,2357 4421,2145 4104,2145 3742,1783 2748,1783
GND (plane layer: these items are gaps in the copper):
  lines w30: 5613,582 6072,582 6072,2358 5613,2358 5613,716 5613,582

## Silkscreen, mask and mechanical layers (free items; w line width, h text height)
Top Overlay:
  text "THERM" at 1726.71,3716.51 h55
  text "GPS" at 2139.69,3716.51 h55
  text "FAN" at 108.03,3547.01 h60
  text "OFF" at 3001.03,3442.01 h60
  text "ON" at 3326.02,3442.01 h60
  text "COMM" at 2604.04,3402.01 h60
  text "BAT" at 1722.03,3108.01 h60
  text "+BL-" at 6087.99,2815.36 h50 r90
  text "ON" at 2578.02,1859.01 h60
  text "OFF" at 3120.03,1858.01 h60
  text "BAT1" at 5805.99,1855.69 h50 r90
  text "+" at 6098.98,1196.35 h110 r90
  text "-BL+" at -95.99,1031.64 h50 r270
  text "PCB: 7000-0303 REV 13" at 5654.49,712.01 h55 r90
  text "PCA: 7500-0390" at 5735.49,711.87 h55 r90
  text "TRANSTECH SYSTEMS, INC" at 5570.33,702.94 h55 r90
  text "+BL-" at -95.99,676.64 h50 r270
  text "+BL-" at 6087.99,385.36 h50 r90
  text "+BL-" at 362.01,333.64 h50 r270
  text "DOMPWR" at 923.22,302.51 h55
  text "PROG" at 4535.43,163.44 h60
  text "COMM" at 2667.04,154.01 h60
Bottom Overlay:
  drawing of 16 lines, arcs and shapes, not listed
Board Outline:
  the board outline again, w30
Fabrication:
  drawing of 295 lines, arcs and shapes, not listed
  text "Layer" at 6695.34,1654 h60
  text "Name" at 7105.26,1654 h60
  text "Material" at 8035,1654 h60
  text "Thickness" at 8894.77,1654 h60
  text "Constant" at 9544.6,1654 h60
  text "Board Layer Stack" at 10114.46,1654 h60
  text "Top Overlay" at 7105.26,1534 h60
  text "Top Solder" at 7105.26,1414 h60
  text "Solder Resist" at 8035,1414 h60
  text "0.39mil" at 8894.77,1414 h60
  text "3.5" at 9544.6,1414 h60
  text "1" at 6695.34,1294 h60
  text "Top Layer" at 7105.26,1294 h60
  text "CF-004" at 8035,1294 h60
  text "1.38mil" at 8894.77,1294 h60
  text "Dielectric 2" at 7105.26,1174 h60
  text "PP-006" at 8035,1174 h60
  text "8.28mil" at 8894.77,1174 h60
  text "4.1" at 9544.6,1174 h60
  text "2" at 6695.34,1054 h60
  text "Power" at 7105.26,1054 h60
  text "0.60mil" at 8894.77,1054 h60
  text "Core" at 7105.26,934 h60
  text "FR-4" at 8035,934 h60
  text "41.93mil" at 8894.77,934 h60
  text "4.8" at 9544.6,934 h60
  text "3" at 6695.34,814 h60
  text "GND" at 7105.26,814 h60
  text "0.60mil" at 8894.77,814 h60
  text "Dielectric 3" at 7105.26,694 h60
  text "PP-006" at 8035,694 h60
  text "8.28mil" at 8894.77,694 h60
  text "4.1" at 9544.6,694 h60
  text "4" at 6695.34,574 h60
  text "Bottom Layer" at 7105.26,574 h60
  text "CF-004" at 8035,574 h60
  text "1.38mil" at 8894.77,574 h60
  text "Bottom Solder" at 7105.26,454 h60
  text "Solder Resist" at 8035,454 h60
  text "0.39mil" at 8894.77,454 h60
  text "3.5" at 9544.6,454 h60
  text "Bottom Overlay" at 7105.26,334 h60
  text "Total board thickness:" at 6695.34,214 h60
  text "63.24mil" at 8894.77,214 h60
Drill Drawing:
  drawing of 177 lines, arcs and shapes, not listed
  text "Symbol" at 6752.28,4367 h72
  text "Count" at 7258.16,4367 h72
  text "Hole Size" at 7858,4367 h72
  text "Plated" at 9007.66,4367 h72
  text "Hole Type" at 9513.54,4367 h72
  text "Drill Layer Pair" at 10247.34,4367 h72
  text "Via/Pad" at 11746.89,4367 h72
  text "Pad Shape" at 12336.74,4367 h72
  text "Template" at 13082.54,4367 h72
  text "Hole Length" at 14432.14,4367 h72
  text "Routed Path Length" at 15297.9,4367 h72
  text "262" at 7258.16,4217 h60
  text "11.81mil (0.300mm)" at 7858,4217 h60
  text "PTH" at 9007.66,4217 h60
  text "Round" at 9513.54,4217 h60
  text "Top Layer - Bottom Layer" at 10247.34,4217 h60
  text "Via" at 11746.89,4217 h60
  text "Rounded" at 12336.74,4217 h60
  text "v60h30" at 13082.54,4217 h60
  text "-" at 14432.14,4217 h60
  text "-" at 15297.9,4217 h60
  text "3" at 7258.16,4067 h60
  text "32.28mil (0.820mm)" at 7858,4067 h60
  text "PTH" at 9007.66,4067 h60
  text "Round" at 9513.54,4067 h60
  text "Top Layer - Bottom Layer" at 10247.34,4067 h60
  text "Pad" at 11746.89,4067 h60
  text "Rounded" at 12336.74,4067 h60
  text "c160h82" at 13082.54,4067 h60
  text "-" at 14432.14,4067 h60
  text "-" at 15297.9,4067 h60
  text "10" at 7258.16,3917 h60
  text "35.43mil (0.900mm)" at 7858,3917 h60
  text "PTH" at 9007.66,3917 h60
  text "Round" at 9513.54,3917 h60
  text "Top Layer - Bottom Layer" at 10247.34,3917 h60
  text "Pad" at 11746.89,3917 h60
  text "(Mixed)" at 12336.74,3917 h60
  text "(Mixed)" at 13082.54,3917 h60
  text "-" at 14432.14,3917 h60
  text "-" at 15297.9,3917 h60
  text "4" at 7258.16,3767 h60
  text "36.22mil (0.920mm)" at 7858,3767 h60
  text "PTH" at 9007.66,3767 h60
  text "Round" at 9513.54,3767 h60
  text "Top Layer - Bottom Layer" at 10247.34,3767 h60
  text "Pad" at 11746.89,3767 h60
  text "Rounded" at 12336.74,3767 h60
  text "(Mixed)" at 13082.54,3767 h60
  text "-" at 14432.14,3767 h60
  text "-" at 15297.9,3767 h60
  text "41" at 7258.16,3617 h60
  text "39.37mil (1.000mm)" at 7858,3617 h60
  text "PTH" at 9007.66,3617 h60
  text "Round" at 9513.54,3617 h60
  text "Top Layer - Bottom Layer" at 10247.34,3617 h60
  text "Pad" at 11746.89,3617 h60
  text "(Mixed)" at 12336.74,3617 h60
  text "(Mixed)" at 13082.54,3617 h60
  text "-" at 14432.14,3617 h60
  text "-" at 15297.9,3617 h60
  text "32" at 7258.16,3467 h60
  text "40.55mil (1.030mm)" at 7858,3467 h60
  text "PTH" at 9007.66,3467 h60
  text "Round" at 9513.54,3467 h60
  text "Top Layer - Bottom Layer" at 10247.34,3467 h60
  text "Pad" at 11746.89,3467 h60
  text "(Mixed)" at 12336.74,3467 h60
  text "(Mixed)" at 13082.54,3467 h60
  text "-" at 14432.14,3467 h60
  text "-" at 15297.9,3467 h60
  text "64" at 7258.16,3317 h60
  text "40.95mil (1.040mm)" at 7858,3317 h60
  text "PTH" at 9007.66,3317 h60
  text "Round" at 9513.54,3317 h60
  text "Top Layer - Bottom Layer" at 10247.34,3317 h60
  text "Pad" at 11746.89,3317 h60
  text "(Mixed)" at 12336.74,3317 h60
  text "(Mixed)" at 13082.54,3317 h60
  text "-" at 14432.14,3317 h60
  text "-" at 15297.9,3317 h60
  text "7" at 7258.16,3167 h60
  text "43.31mil (1.100mm)" at 7858,3167 h60
  text "PTH" at 9007.66,3167 h60
  text "Round" at 9513.54,3167 h60
  text "Top Layer - Bottom Layer" at 10247.34,3167 h60
  text "Pad" at 11746.89,3167 h60
  text "(Mixed)" at 12336.74,3167 h60
  text "(Mixed)" at 13082.54,3167 h60
  text "-" at 14432.14,3167 h60
  text "-" at 15297.9,3167 h60
  text "5" at 7258.16,3017 h60
  text "47.24mil (1.200mm)" at 7858,3017 h60
  text "PTH" at 9007.66,3017 h60
  text "Round" at 9513.54,3017 h60
  text "Top Layer - Bottom Layer" at 10247.34,3017 h60
  text "Pad" at 11746.89,3017 h60
  text "(Mixed)" at 12336.74,3017 h60
  text "(Mixed)" at 13082.54,3017 h60
  text "-" at 14432.14,3017 h60
  text "-" at 15297.9,3017 h60
  text "26" at 7258.16,2867 h60
  text "71.65mil (1.820mm)" at 7858,2867 h60
  text "PTH" at 9007.66,2867 h60
  text "Round" at 9513.54,2867 h60
  text "Top Layer - Bottom Layer" at 10247.34,2867 h60
  text "Pad" at 11746.89,2867 h60
  text "(Mixed)" at 12336.74,2867 h60
  text "(Mixed)" at 13082.54,2867 h60
  text "-" at 14432.14,2867 h60
  text "-" at 15297.9,2867 h60
  text "2" at 7258.16,2717 h60
  text "118.11mil (3.000mm)" at 7858,2717 h60
  text "NPTH" at 9007.66,2717 h60
  text "Round" at 9513.54,2717 h60
  text "Top Layer - Bottom Layer" at 10247.34,2717 h60
  text "Pad" at 11746.89,2717 h60
  text "Rounded" at 12336.74,2717 h60
  text "c0hn300m8" at 13082.54,2717 h60
  text "-" at 14432.14,2717 h60
  text "-" at 15297.9,2717 h60
  text "10" at 7258.16,2567 h60
  text "125.00mil (3.175mm)" at 7858,2567 h60
  text "PTH" at 9007.66,2567 h60
  text "Round" at 9513.54,2567 h60
  text "Top Layer - Bottom Layer" at 10247.34,2567 h60
  text "Pad" at 11746.89,2567 h60
  text "Rounded" at 12336.74,2567 h60
  text "(Mixed)" at 13082.54,2567 h60
  text "-" at 14432.14,2567 h60
  text "-" at 15297.9,2567 h60
  text "B" at 6723.19,2557.01 h66.67
  text "2" at 7258.16,2417 h60
  text "125.98mil (3.200mm)" at 7858,2417 h60
  text "NPTH" at 9007.66,2417 h60
  text "Round" at 9513.54,2417 h60
  text "Top Layer - Bottom Layer" at 10247.34,2417 h60
  text "Pad" at 11746.89,2417 h60
  text "Rounded" at 12336.74,2417 h60
  text "c0hn320" at 13082.54,2417 h60
  text "-" at 14432.14,2417 h60
  text "-" at 15297.9,2417 h60
  text "Symbol" at 6752.28,2267 h72
  text "Count" at 7258.16,2267 h72
  text "2" at 7258.16,2267 h60
  text "Hole Size" at 7692.06,2267 h72
  text "127.95mil (3.250mm)" at 7858,2267 h60
  text "Plated" at 8413.86,2267 h72
  text "Hole Type" at 8919.74,2267 h72
  text "PTH" at 9007.66,2267 h60
  text "Round" at 9513.54,2267 h60
  text "Drill Layer Pair" at 9653.54,2267 h72
  text "Top Layer - Bottom Layer" at 10247.34,2267 h60
  text "Via/Pad" at 10843.2,2267 h72
  text "Pad Shape" at 11433.04,2267 h72
  text "Pad" at 11746.89,2267 h60
  text "Template" at 12178.84,2267 h72
  text "Rounded" at 12336.74,2267 h60
  text "Hole Length" at 12828.67,2267 h72
  text "c500h325m505mx505p500" at 13082.54,2267 h60
  text "Routed Path Length" at 13694.43,2267 h72
  text "-" at 14432.14,2267 h60
  text "-" at 15297.9,2267 h60
  text "470 Total" at 7258.16,2117 h60

## Dimensions
-127,3795 to 6125,-200 on Dimension
-127,-200 to -127,3795 on Dimension

## Text inside footprints (layer, text, board x,y; h text height)
J4: Top Overlay "1" at 1344,3257.44 h40 r180
J5: Top Overlay "1" at 705.64,3257.03 h40 r180
J9: Top Overlay "1" at 3968.15,3264.87 h40 r180
J10: Top Overlay "1" at 3510.68,3255.44 h40 r180
J11: Top Overlay "6" at 3885.09,116.83 h40 r5; Top Overlay "9" at 3436.09,110.83 h40 r5; Top Overlay "5" at 3380,219 h40; Top Overlay "1" at 3943,220 h40
S1: Top Overlay "3" at 2760.35,1854 h40; Top Overlay "1" at 2860.35,1854 h40; Top Overlay "2" at 2960.35,1854 h40